# Altium PCB 24V-20A-Power-Board-v1.0.PcbDoc (part 1 of 4)
Units mil, origin at the board's own origin, x right, y up, seen from the top; angles counter-clockwise.
Board outline 6298 x 5166 mil, 4 copper layers (Top Layer, Layer-1, Layer-2, Bottom Layer), stack 61.653 mil thick; 190 components, 110 nets, 477 pads, 30 vias.
Unrouted connection lines stored in the file: 351.
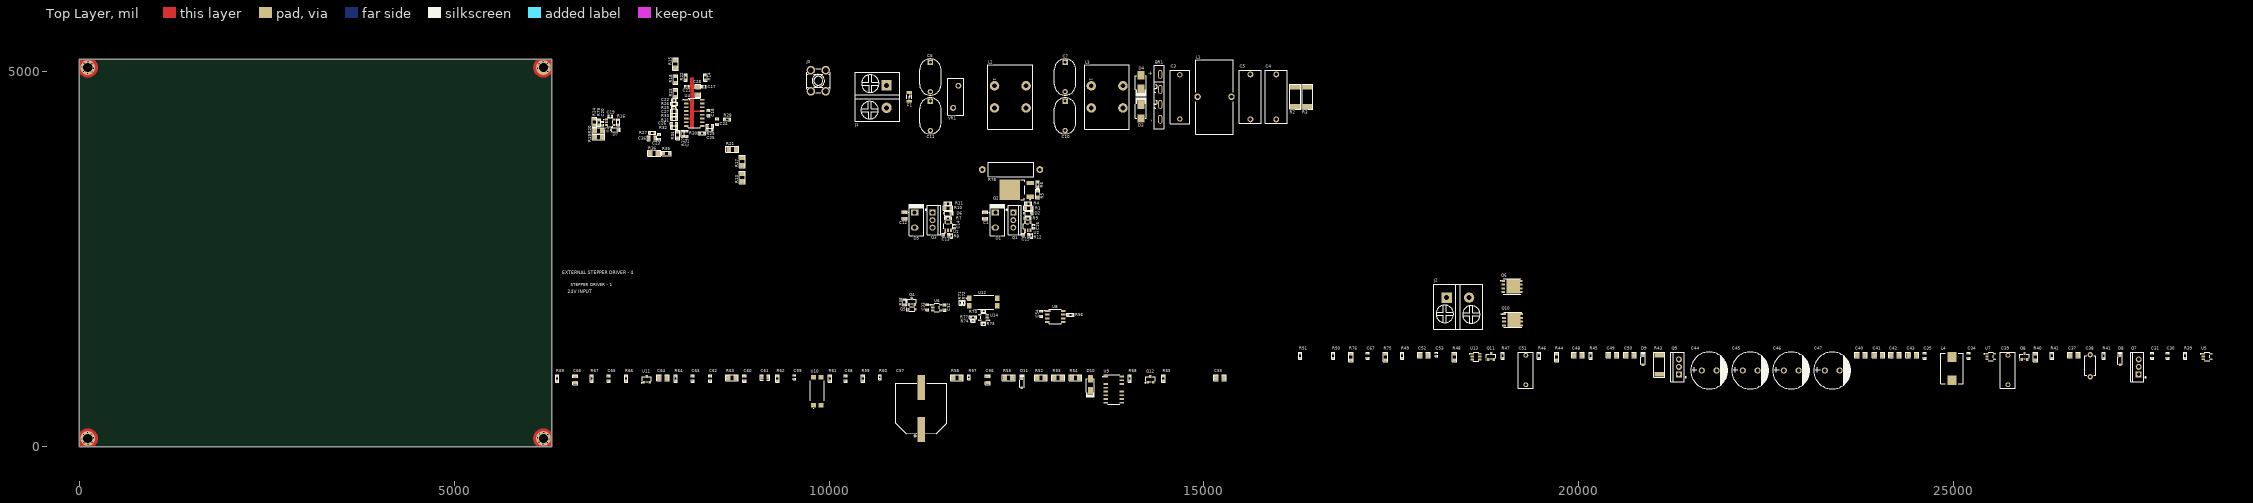
[diagram p0: Top Layer view]
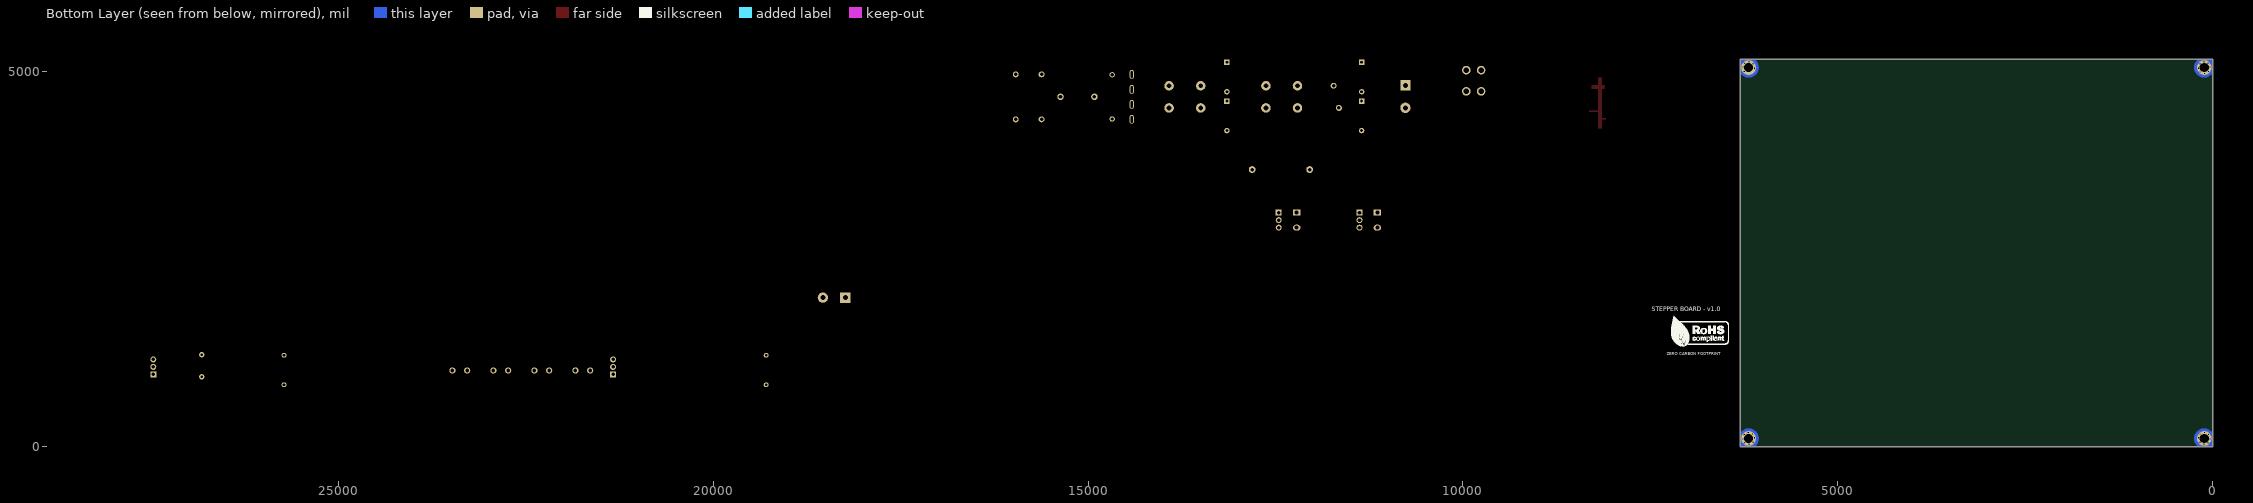
[diagram p1: Bottom Layer view, seen from below]

## Layer stack, top to bottom
Top Solder: solder mask 0.394, Solder Resist, Dk 3.5
Top Layer: signal copper 1.378
Dielectric 2: prepreg 7.992, PP-006, Dk 4.1
Layer-1: signal copper 1.181
Dielectric 1: core 40.551, FR-4, Dk 4.8
Layer-2: signal copper 1.181
Dielectric 3: prepreg 7.992, PP-006, Dk 4.1
Bottom Layer: signal copper 1.378
Bottom Solder: solder mask 0.394, Solder Resist, Dk 3.5

## Board outline
0,0 0,5163.74 0,5166 6298,5166 6298,0

## Design rules (kind name [scope] priority, off if disabled: settings)
Clearance [All] p1: gap=7 ignorepadtopadclearanceinfootprint=FALSE
HoleSize [All] p1: absolutevalues=TRUE maxlimit=1000 minlimit=1 maxpercent=80.000 minpercent=20.000
HoleToHoleClearance [All] p1: gap=1 allowstackedmicrovias=TRUE
MinimumSolderMaskSliver [All] p1: minsoldermaskwidth=0
PolygonConnect [All] p1: connectstyle=Direct reliefconductorwidth=10 reliefentries=4 polygonreliefangle="90 Angle" airgapwidth=10
RoutingVias [All] p1: holewidth=11.81 width=23.62 viastyle="Through Hole" minholewidth=11.81 minwidth=23.62 maxholewidth=11.81 maxwidth=23.62
SilkToSilkClearance [All] p1: silktosilkclearance=0
SilkToSolderMaskClearance [IsPad] p1: minsilkscreentomaskgap=0 clearancetoexposedcopper=TRUE
SolderMaskExpansion [All] p1: expansion=4 istentingtop=FALSE
UnRoutedNet [All] p1: checkbadconnections=TRUE
Width [All] p1: maxlimit=100 minlimit=6 preferedwidth=12 minimp=50.000000 maximp=50.000000 favimp=50.000000
24 further rules are at their usual default settings.

## Classes and differential pairs
component class U_Connector_Sheet: J1 J2 J3
component class U_24V_Sheet: C30 C31 C32 C33 C34 C35 C37 C38 C39 C40 C41 C42 C43 C44 C45 C46 C47 C48 C49 C50 C51 C52 C53 C54 C55 C56 C57 C58 C59 C60 C61 C62 C63 C64 C65 C66 C67 D8 D9 D10 D11 L4 Q4 Q5 Q6 Q7 Q8 Q9 Q10 Q11 Q12 R38 R39 R40 R41 R42 R43 R44 R45 R46 R47 R48 R49 R50 R51 R52 R53 R54 R55 R56 R57 R58 R59 R60 R61 R62 R63 R64 R65 R66 R67 R68 R69 R70 R71 R72 R73 R74 R75 R76 R77 T3 T4 U5 U6 U7 U8 U9 U10 U11 U12 U13 U14
component class U_Power_Sheet: BR1 C1 C3 C4 C5 C6 C7 C10 C11 C12 C13 C14 C15 C16 C17 C18 C19 C20 C21 C22 C23 C24 C25 C26 C27 C28 C29 C36 D1 D2 D3 D4 D5 D6 D7 F1 L1 L2 L3 Q1 Q2 Q3 R1 R2 R3 R4 R5 R6 R7 R8 R9 R10 R11 R12 R13 R14 R15 R16 R17 R18 R19 R20 R21 R22 R23 R24 R25 R26 R27 R28 R29 R30 R31 R32 R33 R34 R35 R36 R37 R78 R79 U1 U2 U3 U4 VR1

## Components (designator, comment, footprint, x,y, rotation, side; value= is the part's Value field where it differs from the comment)
BR1 "GBU2510-G" GBU 14417,4665.85 r270 top
C1 "470pF" Cap-0805 12084,3083 r90 top
C3 "470nF" 450MPK474J 14678,4665.85 r90 top
C4 "330nF" MPP334J2J15AJ22800 15964,4665.85 r90 top
C5 "330nF" MPP334J2J15AJ22800 15620,4665.85 r90 top
C6 "2.2nF" AY1222M47Y5UC63L0 11350,4931 r270 top
C7 "2.2nF" AY1222M47Y5UC63L0 13148,4931 r270 top
C10 "2.2nF" AY1222M47Y5UC63L0 13148,4412 r270 top
C11 "2.2nF" AY1222M47Y5UC63L0 11350,4412 r270 top
C12 "470pF" Cap-0805 11008,3083 r90 top
C13 "2.2uF" CAP-0603 11560,2823 r180 top
C14 "100pF" Cap-0402 11672,2938 r270 top
C15 "2.2uF" CAP-0603 12626,2823 r180 top
C16 "100pF" Cap-0402 12733,2938 r270 top
C17 "22PF" Cap-0402 8332,4805 r0 top value=22pF
C18 "1uF" Cap-0603 8392,4451 r270 top
C19 "100nF" cap-0402 7081.5,4412 r0 top
C20 "100nF" cap-0402 6976,4309 r270 top
C21 "22PF" Cap-0402 8104,4805 r180 top value=22pF
C22 "1nF" Cap-0402 7932,4622 r0 top
C23 "820pF" Cap-0603 7734,4132 r90 top
C24 "1000pF" Cap-0603 8509,4335 r90 top
C25 "6.8nF" Cap-0603 8409,4277 r180 top
C26 "1nF" Cap-0603 7932,4308 r0 top
C27 "6.8nF" Cap-0603 7933,4478 r0 top
C28 "220nF" Cap-1206 8251,4747 r270 top
C29 "680pF" Cap-0603 8099,4174 r90 top
C30 "1uF" Cap-0603 27858.02,1212.51 r90 top
C31 "2.2uF" Cap-0603 27648.02,1212.51 r90 top
C32 "4.7uF" Cap-0603 11543,1856 r90 top
C33 "1uF" Cap-0603 11310,1859 r90 top
C34 "1uF" Cap-0603 25203.02,1212.51 r90 top
C35 "2.2uF" Cap-0603 24616.02,1212.51 r90 top
C36 "2.2uF" Cap-0805 7637,4116 r180 top
C37 "82pF" Cap-1206 26606.02,1222.51 r0 top
C38 "2.2nF" KJKF222M2FF7035A075E 26823.02,1078.51 r90 top
C39 "4.7nF" MMK472J3AC2KN206G0 25725.02,1021.51 r90 top
C40 "4.7uF" Cap-1206 23766.02,1222.51 r0 top
C41 "4.7uF" Cap-1206 23996.02,1222.51 r0 top
C42 "4.7uF" Cap-1206 24219.02,1222.51 r0 top
C43 "4.7uF" Cap-1206 24449.02,1222.51 r0 top
C44 "680uF" ERS1HM681W20OT 21740.02,1015.51 r0 top
C45 "680uF" ERS1HM681W20OT 22287.02,1015.51 r0 top
C46 "680uF" ERS1HM681W20OT 22834.02,1015.51 r0 top
C47 "680uF" ERS1HM681W20OT 23381.02,1015.51 r0 top
C48 "82pF" Cap-1206 19992.02,1222.51 r0 top
C49 "82pF" Cap-1206 20452.02,1222.51 r0 top
C50 "150pF" Cap-1206 20682.02,1222.51 r0 top
C51 "4.7nF" MMK472J3AC2KN206G0 19294.02,1021.51 r90 top
C52 "82pF" Cap-1206 17938.02,1222.51 r0 top
C53 "RF15N3R3C500CT" Cap-0402 18100.02,1230.51 r90 top
C54 "1uF" Cap-0603 12831,1773 r90 top
C55 "0.1uF" Cap-1206 15213.02,917.51 r0 top
C56 "0.1uF" Cap-0805 12116.02,892.51 r90 top value=100nF
C57 "1000uF" VZH102M1HTR-1616 11229.02,510.51 r90 top
C58 "100nF" Cap-0603 10222.02,907.51 r90 top
C59 "47nF" Cap-0402 9536.02,925.51 r90 top
C60 "4.7UF" Cap-0603 8871.02,907.51 r90 top
C61 "0.1uF" Cap-0805 9144.02,922.51 r0 top value=100nF
C62 "100pF" Cap-0603 8412.02,907.51 r90 top
C63 "10pF" Cap-0603 8182.02,907.51 r90 top
C64 "220nF" Cap-1206 7785.02,917.51 r0 top
C65 "10pF" Cap-0603 7062.02,907.51 r90 top
C66 "0.01uF" Cap-0805 6615.02,892.51 r90 top value=10nF
C67 "1uF" Cap-0603 17185.02,1212.51 r90 top
D1 "MUR860G" TO-220-2 12217,3020.99 r270 top
D2 "BAT54HT1G" SOD-323 12650.09,3112 r180 top
D3 "RS1MB-13-F" SMB_ 14159,4468.45 r90 top value=15pF
D4 "RS1MB-13-F" SMB_ 14159,4863 r270 top value=15pF
D5 "MUR860G" TO-220-2 11140,3020.99 r270 top
D6 "BAT54HT1G" SOD-323 11578.1,3112 r180 top
D7 "BZT52C5V1S-7-F" SOD-323 7136,4227 r180 top
D8 "SD103BW-7-F" SOD-123 27221.02,1153.51 r90 top
D9 "SD103BW-7-F" SOD-123 20857.02,1153.51 r90 top
D10 "US1J-13-F" SMA 13485.02,827.51 r90 top
D11 "SD103BW-7-F" SOD-123 12571.02,848.51 r90 top
F1 "0501010.WR1" "Fuse 1206 (3216 Metric)" 11070,4665.85 r90 top
J1 "DBT50G-7.62-2P-BK-P" DBT50G-7.62-2P-BK-P 10766,4669 r270 top
J2 "DBT50G-7.62-2P-BK-P" DBT50G-7.62-2P-BK-P 18387,1988 r0 top
J3 "T44001" T44001 9855.58,4880.73 r0 top
L1 "150uH" 7447076 15141,4665.85 r90 top
L2 "1MH" 7448031501 12417,4665.85 r270 top value=1mH
L3 "1MH" 7448031501 13708,4665.85 r270 top value=1mH
L4 "PA2607.301NLT" PA2607.301NLT 24976.02,1040.51 r90 top
Q1 "IPA60R120P7XKSA1" TO-220-3 12456.98,3021.49 r270 top
Q2 "AOD4S60" TO-252-2L 12547,3426 r90 top
Q3 "IPA60R120P7XKSA1" TO-220-3 11378.98,3021.49 r270 top
Q4 "MMBTA06-7-F" SOT-23 11103,1936 r0 top
Q5 "BZX384-C15,115" SOD-323 11104,1834 r0 top
Q6 "CSD19502Q5B" VSON-CLIP-8(6x5) 19111,2137 r0 top
Q7 "IPA60R120P7XKSA1" TO-220-3 27469.02,1063.51 r90 top
Q8 "BC858C-7-F" SOT-23 25946.02,1202.51 r0 top
Q9 "IPA60R120P7XKSA1" TO-220-3 21336.02,1063.51 r90 top
Q10 "CSD19502Q5B" VSON-CLIP-8(6x5) 19120,1692 r0 top
Q11 "BC858C-7-F" SOT-23 18830.02,1202.51 r0 top
Q12 "MMBT2222A-7-F" SOT-23 14286.02,897.51 r0 top
R1 "18.2R" RES-0805 12658,3181.5 r180 top
R2 "30mR" RES-2512 16216,4665.75 r270 top
R3 "30mR" RES-2512 16381,4665.75 r270 top
R4 "10K" Res-0603 12658,3243 r180 top
R5 "18.2R" RES-0805 12782,3370 r90 top
R6 "49K9" Res-0603 12782,3497 r270 top
R7 "2.2R" Res-0603 11587,3046 r0 top
R8 "10R" Res-0402 11634,2812 r90 top
R9 "2.2R" Res-0603 12648.49,3046 r0 top
R10 "18.2R" RES-0805 11586,3181.5 r180 top
R11 "10K" Res-0603 11586,3243 r180 top
R12 "10R" Res-0402 12702,2812 r90 top
R13 "2.7MR" Res-1206 8842,3592 r90 top
R14 "16.5K" Res-0603 8351,4924 r90 top
R15 "3.09MR" Res-1206 7950,5106 r90 top
R16 "10K" Res-0603 7189,4326 r90 top value=10kR
R17 "2.7MR" Res-1206 8842,3805 r90 top
R18 "2.74MR" RES-0805 7950,4895.5 r90 top
R19 "511K" Res-1206 6925,4130 r0 top
R20 "511K" Res-1206 6925,4216 r180 top
R21 "2.7MR" Res-1206 8708,3966 r0 top
R22 "16.5K" Res-0603 8085,4924 r90 top
R23 "2.74MR" RES-0805 7950,4714 r90 top
R24 "49.9K" RES-0805 6871,4328 r270 top
R25 "95.3K" Res-0402 7932,4526 r0 top
R26 "133K" Res-0603 7933,4575 r0 top
R27 "7.5K" Res-0603 7639,4188 r0 top
R28 "100R" Res-0603 8640,4366 r0 top
R29 "66.5K" Res-0603 8409,4225 r0 top
R30 "66.5K" Res-0603 8303,4180 r180 top
R31 "66.5K" Res-0603 7932,4378 r0 top
R32 "124K" Res-0603 7932,4257 r0 top
R33 "66.5K" Res-0603 7932,4428 r0 top
R34 "2.74MR" RES-0805 7980,4157 r270 top
R35 "2.74MR" RES-0805 7833,3912 r180 top
R36 "2.7MR" Res-1206 7667,3912 r180 top
R37 "82.5K" Res-0603 8048,4174 r90 top
R38 "6.8K" Res-0603 11006,1927 r90 top value=6.8kR
R39 "4.7R" Res-0603 28088.02,1213.51 r90 top
R40 "10R" RES-0805 26091.02,1197.51 r90 top
R41 "22R" Res-0603 27003.02,1213.51 r90 top
R42 "4.7K" Res-0603 26313.02,1213.51 r90 top
R43 "0.5mR" RES-2512 21074.02,1092.51 r90 top
R44 "10R" RES-0805 19707.02,1197.51 r90 top
R45 "22R" Res-0603 20159.02,1213.51 r90 top
R46 "59.7K" Res-0603 19470.02,1213.51 r90 top value=59.7kR
R47 "4.7K" Res-0603 18985.02,1213.51 r90 top
R48 "200R" RES-0805 18343.02,1197.51 r90 top
R49 "10K" Res-0603 17645.02,1213.51 r90 top
R50 "4.7R" Res-0603 16725.02,1213.51 r90 top
R51 "113K" Res-0603 16285.02,1213.51 r90 top value=113kR
R52 "1K" Res-1206 12826.02,917.51 r0 top
R53 "1K" Res-1206 13056.02,917.51 r0 top
R54 "1K" Res-1206 13286.02,917.51 r0 top
R55 "374K" Res-1206 12396.02,917.51 r0 top value=374kR
R56 "10K" Res-0603 13221,1761 r180 top
R57 "6.04K" Res-0402 11868.02,925.51 r90 top
R58 "374K" Res-1206 11706.02,917.51 r0 top value=374kR
R59 "750K" Res-0603 10452.02,908.51 r90 top
R60 "6.04K" Res-0402 10677.02,925.51 r90 top
R61 "147K" Res-0603 10012.02,908.51 r90 top value=147kR
R62 "10K" Res-0603 9311.02,908.51 r90 top
R63 "374K" Res-1206 8704.02,917.51 r0 top value=374kR
R64 "487K" Res-0603 7952.02,908.51 r90 top value=487kR
R65 "113K" Res-0603 14461.02,908.51 r90 top value=113kR
R66 "10K" Res-0603 7292.02,908.51 r90 top
R67 "10K" Res-0603 6832.02,908.51 r90 top
R68 "10K" Res-0603 14011.02,908.51 r90 top
R69 "16.9K" Res-0603 6372.02,908.51 r90 top
R70 "1M" Res-0402 12060,1809 r180 top value=1MR
R71 "6.04K" Res-0402 11753,1920 r90 top
R72 "6.04K" Res-0402 11796,1920 r90 top
R73 "330K" Res-0402 12060,1637 r0 top value=330kR
R74 "1M" Res-0402 11918,1679 r0 top value=1MR
R75 "10R" RES-0805 17423.02,1197.51 r90 top
R76 "10R" RES-0805 16963.02,1197.51 r90 top
R77 "10K" Res-0603 11919,1725 r180 top
R78 "KNP2W-47Ω±5% T" KNP2W-47O±5 12427,3696 r180 top
R79 "1.1MR" Res-0603 6930,4324 r90 top
U1 "UCC27517DBVR" SOT-23-5 11587,2938 r90 top
U2 "UCC27517DBVR" SOT-23-5 12648.49,2938 r90 top
U3 "TLV171IDBVR" SOT-23-5 7080,4327 r0 top
U4 "UCC28064ADR" SOIC-16 8202,4451 r0 top locked
U5 "UCC24612-1DBVR" SOT-23-5 28381.02,1202.51 r0 top
U6 "LP2981-50DBVR" SOT-23-5 11435,1855 r0 top
U7 "UCC24612-1DBVR" SOT-23-5 25496.02,1202.51 r0 top
U8 "LP2951ACMX/NOPB" SOIC-8 13015,1736 r0 top
U9 "UCC25630-1DDBR" UCC25630-1DDBR 13798.02,759.51 r0 top
U10 "VO618A-3X017T" "4-SMD  (SFH617A-1X007T)" 9843.02,738.51 r90 top
U11 "TL431ACDBZR" SOT-23 7567.02,897.51 r0 top
U12 "VO618A-3X017T" "4-SMD  (SFH617A-1X007T)" 12057,1928 r0 top
U13 "INA181A4IDBVR" SOT-23-6 18630.02,1201.51 r0 top
U14 "TL331IDBVR" SOT-23-5 12059,1723 r180 top
VR1 "B72210S2271K101" B72210S2271K101 11689,4666.26 r90 top value=195pF

## Footprints (in the part's own frame and the unit in brackets; to place one, negate y for a bottom-side part, rotate by r counter-clockwise, add the part's x,y. Pads: shape width x height; smd on the part's side, far side on the other; paste and mask are expansions set on the pad)
"4-SMD  (SFH617A-1X007T)" [mm]
  rect 1.52x1.78 smd mask+0.07: 1(-4.765,1.27) 2(-4.765,-1.27) 3(4.765,-1.27) 4(4.765,1.27)
  silkscreen extent -5.81,-2.36 3.53,2.36, body extent -5.08,-2.29 5.08,2.29, height 3.75
450MPK474J [mm]
  round 1.8 hole 1.092 paste-0.8 mask+0: 1(-7.5,0) 2(7.5,0)
  silkscreen extent -9.06,-3.3 9.06,3.3, body extent -9,-3.25 9,3.25, height 11.8
7447076 [mm]
  round 2.2 hole 1.2: 1(0,5.75) 2(0,-5.75)
  silkscreen extent -12.61,-6.3 12.61,6.3, body extent -12.56,-6.25 12.56,6.25, height 25.56
7448031501 [mm]
  round 3.2 hole 1.6: 1(-3.75,-5.35) 2(3.75,-5.35) 3(3.75,5.35) 4(-3.75,5.35)
  silkscreen extent -10.92,-7.57 10.92,7.54, body extent -10.87,-7.5 10.87,7.5, height 21.65
AY1222M47Y5UC63L0 [mm]
  rect 1.8x1.8 hole 1: 1(-5,0)
  round 1.8 hole 1: 2(5,0)
  silkscreen extent -6.12,-3.63 6.12,3.63, body extent -6,-3.5 6,3.5, height 16
B72210S2271K101 [mm]
  round 2 hole 1.2 paste+0 mask+0.051: 1(-3.749,0.899) 2(3.749,-0.899)
  silkscreen extent -6.27,-2.72 6.25,2.7, body extent -6.25,-2.7 6.25,2.7, height 13.35
Cap-0402 [mil]
  rect 18x25 smd mask+2.36: 1(-18.5,0) 2(18.5,0)
  silkscreen extent -31,-16 31,16, body extent -20,-10 20,10, height 19
cap-0402 [mil]
  rect 18x25 smd mask+2.36: 1(-18.5,0) 2(18.5,0)
  silkscreen extent -31,-16 31,16, body extent -20,-10 20,10, height 19
CAP-0603 [mil]
  rect 30x35 smd mask+2.36: 1(-30,0) 2(30,0)
  silkscreen extent -49,-21 49,21, body extent -32,-16 31,16, height 34
Cap-0603 [mil]
  rect 30x35 smd mask+2.36: 1(-30,0) 2(30,0)
  silkscreen extent -49,-21 49,21, body extent -32,-16 31,16, height 34
Cap-0805 [mil] "SMD 0805"
  rect 40x60 smd mask+2.76: 1(-40,0) 2(40,0)
  silkscreen extent -64,-34 64,34, body extent -39,-25 39,25, height 30
Cap-1206 [mil] "SMD 1206"
  rect 60x70 smd: 1(-50,0) 2(50,0)
  silkscreen extent -84,-39 84,39, body extent -63,-31 63,32, height 39
DBT50G-7.62-2P-BK-P [mm]
  rect 3.5x3.5 hole 1.7: 1(-3.81,0)
  round 3.5 hole 1.7: 2(3.81,0)
  silkscreen extent -8.22,-10.65 8.38,4.55, body extent -8.25,-10.67 8.25,4.53, height 16.3
ERS1HM681W20OT [mm]
  round 2.1 hole 1.2 paste+0 mask+0.05: 1(-2.5,0) 2(2.5,0)
  silkscreen extent -6.25,-6.25 6.25,6.25, body extent -6.24,-6.25 6.25,6.25, height 19.91
"Fuse 1206 (3216 Metric)" [mm] "0.126\" L x 0.062\" W x 0.026\" H (3.20mm x 1.58mm x 0.65mm)"
  rect 1.06x1.82 smd: 1(-1.528,0) 2(1.528,0)
  silkscreen extent -0.68,-0.85 0.68,0.85, body extent -1.6,-0.79 1.6,0.79, height 0.85
GBU [mm]
  oval 3x1.4 hole 0.7 slot 2.2 at 0 deg paste+0 mask+0.051: 1(-7.62,0) 2(-2.54,0) 3(2.54,0) 4(7.62,0)
  silkscreen extent -10.8,-2.28 10.79,1.25, body extent -10.75,-2.26 10.75,1.2, height 19.9
KJKF222M2FF7035A075E [mm]
  round 1.8 hole 0.92 paste+0 mask+0.051: 1(-3.75,0) 2(3.75,0)
  silkscreen extent -3.22,-1.8 3.38,1.8, body extent -4.08,-1.85 4.08,1.85, height 6.75
KNP2W-47O±5 [mm]
  round 2.3 hole 1.2 paste+0 mask+0.051: 1(-9.75,0) 2(9.75,0)
  silkscreen extent -7.75,-2.5 7.75,2.5, body extent -10.05,-2.51 10.05,2.51, height 5.01
MMK472J3AC2KN206G0 [mm]
  round 1.65 hole 0.9 paste+0 mask+0.051: 1(-5,0) 2(5,0)
  silkscreen extent -6.1,-2.54 6.1,2.54, body extent -6,-2.5 6,2.5, height 11
MPP334J2J15AJ22800 [mm]
  round 2 hole 1.2 paste+0 mask+0.051: 1(-7.62,0) 2(7.62,0)
  silkscreen extent -9,-3.75 9,3.75, body extent -9,-3.75 9,3.75, height 13.5
PA2607.301NLT [mm]
  rect 3.3x3.05 smd: 1(-3.935,0) 2(3.935,0)
  silkscreen extent -5.15,-3.83 5.15,3.83
Res-0402 [mil]
  rect 18x25 smd mask+2.17: 1(-18.5,0) 2(18.5,0)
  silkscreen extent -32,-17 32,16, body extent -23,-11 23,11, height 16
Res-0603 [mil]
  rect 30x35 smd: 1(-30,0) 2(30,0)
  silkscreen extent -48,-21 48,21, body extent -31,-17 31,17, height 18
RES-0805 [mil] "SMD 0805"
  rect 40x50 smd: 1(-40,0) 2(40,0)
  silkscreen extent -64,-29 64,29, body extent -39,-25 39,24, height 24
Res-1206 [mil]
  rect 60x70 smd: 1(-50,0) 2(50,0)
  silkscreen extent -84,-39 84,39, body extent -63,-31 63,31, height 24
RES-2512 [mm]
  rect 1.6x3.4 smd: 1(-3.25,0) 2(3.25,0)
  silkscreen extent -4.24,-1.85 4.24,1.85, body extent -3.17,-1.63 3.18,1.63, height 0.58
SMA [mm]
  rect 2.5x1.7 smd: 1(-2,0) 2(2,0)
  silkscreen extent -4.45,-1.42 2.06,1.42, body extent -2.6,-1.3 2.6,1.3, height 2.4
SMB_ [mm]
  rect 2.8x2.4 smd: 1(-2.3,0) 2(2.3,0)
  silkscreen extent -2.21,-1.9 4.83,1.91, body extent -2.7,-1.8 2.7,1.8, height 2.3
SOD-123 [mm]
  rect 0.95x0.9 smd: 1(-1.575,0) 2(1.575,0)
  silkscreen extent -1.37,-0.8 2.82,0.8, body extent -1.82,-0.78 1.83,0.78, height 1.5
SOD-323 [mm]
  rect 0.8x0.9 smd mask+0.055: 1(-1.15,0) 2(1.15,0)
  silkscreen extent -2.01,-0.79 0.94,0.79, body extent -1.3,-0.67 1.3,0.67, height 1.1
SOIC-8 [mm]
  rect 1.55x0.6 smd: 1(-2.7,1.905) 2(-2.7,0.635) 3(-2.7,-0.635) 4(-2.7,-1.905) 5(2.7,-1.905) 6(2.7,-0.635) 7(2.7,0.635) 8(2.7,1.905)
  silkscreen extent -3.76,-2.49 1.99,2.49, body extent -3,-2.45 3,2.45, height 1.7
SOIC-16 [mm]
  rect 1.55x0.6 smd: 1(-2.7,4.445) 2(-2.7,3.175) 3(-2.7,1.905) 4(-2.7,0.635) 5(-2.7,-0.635) 6(-2.7,-1.905) 7(-2.7,-3.175) 8(-2.7,-4.445) 9(2.7,-4.445) 10(2.7,-3.175) 11(2.7,-1.905) 12(2.7,-0.635) 13(2.7,0.635) 14(2.7,1.905) 15(2.7,3.175) 16(2.7,4.445)
  silkscreen extent -3.82,-5 2.03,5, body extent -3,-4.95 3,4.95, height 1.75
SOT-23 [mm] "TRANS NPN 40V 0.6A SOT23"
  rect 0.82x0.92 smd: 1(-0.95,-1) 2(0.95,-1) 3(0,1)
  silkscreen extent -1.68,-1.3 1.55,0.81, body extent -1.5,-1.25 1.5,1.25, height 1.05
SOT-23-5 [mm]
  rect 1.1x0.6 smd: 1(-1.3,0.95) 2(-1.3,0) 3(-1.3,-0.95) 4(1.3,-0.95) 5(1.3,0.95)
  silkscreen extent -2.13,-1.5 0.88,1.5, body extent -1.4,-1.45 1.4,1.45, height 1.45
SOT-23-6 [mm]
  rect 1.22x0.62 smd: 1(-1.31,0.95) 2(-1.31,0) 3(-1.31,-0.95) 4(1.31,-0.95) 5(1.31,0) 6(1.31,0.95)
  silkscreen extent -2.18,-1.52 0.86,1.52, body extent -1.5,-1.5 1.5,1.5, height 1.47
T44001 [mm]
  round 2.9 hole 1.9 paste+0 mask+0.051: 1(-2.5,-3.6) 1(-2.5,3.6) 1(2.5,-3.6) 1(2.5,3.6)
  silkscreen extent -4,-4 4,4, body extent -4.1,-4.1 4.1,4.1, height 9.93
TO-220-2 [mm]
  rect 2x2.5 hole 1.4 paste+0 mask+0.051: 1(-2.54,0)
  oval 2x2.5 hole 1.4 paste+0 mask+0.051: 2(2.54,0)
  silkscreen extent -5.35,-2.06 5.35,3.14, body extent -5.33,-1.71 5.33,3.1, height 22.95
TO-220-3 [mm]
  rect 2x2 hole 1.2 paste+0 mask+0.051: 1(-2.54,0)
  round 2 hole 1.2 paste+0 mask+0.051: 2(0,0) 3(2.54,0)
  silkscreen extent -5,-2.49 5.03,2.72, body extent -5.05,-1.75 5.05,2.75, height 14.9
TO-252-2L [mm]
  rect 1.5x2.5 smd: 1(-2.3,-3.45) 3(2.3,-3.45)
  rect 7x7 smd: 2(0,3.45)
  silkscreen extent -3.35,-3.53 3.33,-0.2, body extent -3.27,-4.31 3.27,5.63, height 2.34
UCC25630-1DDBR [mm]
  rect 1.55x0.6 smd paste+0 mask+0.051: 1(-2.7,4.445) 3(-2.7,1.905) 4(-2.7,0.635) 5(-2.7,-0.635) 6(-2.7,-1.905) 7(-2.7,-3.175) 8(-2.7,-4.445) 9(2.7,-4.445) 10(2.7,-3.175) 11(2.7,-1.905) 12(2.7,-0.635) 14(2.7,1.905) 15(2.7,3.175) 16(2.7,4.445)
  silkscreen extent -3.71,-5 2,5, body extent -3.01,-4.95 3.01,4.95, height 1.75
VSON-CLIP-8(6x5) [mm]
  rect 1.27x0.7 smd paste-100 mask+0.051: 1(-3,1.904) 2(-3,0.636) 3(-3,-0.636) 4(-3,-1.906)
  rect 1x0.7 smd paste-100 mask+0.051: 5(3,-1.904) 6(3,-0.634) 7(3,0.636) 8(3,1.906)
  rect 4.5x4.9 smd paste-100 mask+0.051: 8(0.39,0.001)
  silkscreen extent -3.91,-2.57 3,2.55, body extent -3,-2.45 3,2.45, height 1.1
VZH102M1HTR-1616 [mm]
  rect 8.5x2.6 smd paste+0 mask+0.051: 1(-7.093,0) 2(7.093,0)
  silkscreen extent -9.77,-8.58 8.58,8.58, body extent -9,-8.5 9,8.5, height 16.55

## Part data
BR1: "BRIDGE RECT 1PHASE 1KV 25A GBU", Average Rectified Current=25A, LCSC Part Number=C3012677, Manufacturer=Comchip, Max Operating Temperature=150°C, Max Reverse Leakage Current=10uA, Max Surge Current=350A, Min Operating Temperature=-55°C, Package Quantity=200, ComponentLink1Description=https://datasheet.ciiva.com/886/gbu25005-gthru-gbu2510-grevc-886136.pdf?src-supplier=Digikey, ComponentLink1URL=https://datasheet.ciiva.com/886/gbu25005-gthru-gbu2510-grevc-886136.pdf?src-supplier=Digikey, Item Type="Bridge Rectifier", Lead Free="Lead Free", Manufacturer Part Number=GBU2510-G, Mounting Technology="Through Hole", Packaging=Rail/Tube, Pricing="26=1.143, 100=1.0083, 500=0.9074, 1000=0.8027 (USD)", RoHS=Yes, RoHS Compliant=Yes, Series=-, Stock=26, Supplier="Arrow Electronics"
C1 C12: library part CC0805KRX7RBBB471, "CAP CER 470PF 500V X7R 0805", Case Code (Imperial)=0805, Case Code (Metric)=2012, Dielectric=X7R, LCSC Part Number=C113867, Manufacturer=Yageo, Max Operating Temperature=125°C, Min Operating Temperature=-55°C, Package Quantity=4000, Tolerance=10%, Voltage Rating=500V, Case/Package=0805, ComponentLink1Description=http://www.mouser.com/ds/2/447/Yageo_UPY-GP_NP0_16V-to-50V_9-358835.pdf?src-supplier=Mouser, ComponentLink1URL=http://www.mouser.com/ds/2/447/Yageo_UPY-GP_NP0_16V-to-50V_9-358835.pdf?src-supplier=Mouser, ComponentLink2Description=https://www.yageo.com/upload/media/product/products/datasheet/mlcc/UPY-NP0X7R_MV_100-to-630V_21.pdf?src-supplier=Digikey, ComponentLink2URL=https://www.yageo.com/upload/media/product/products/datasheet/mlcc/UPY-NP0X7R_MV_100-to-630V_21.pdf?src-supplier=Digikey, ComponentLink3Description=http://www.yageo.com/documents/recent/UPY-NP0X7R_MV_100-to-630V_19.pdf?src-supplier=Digikey, ComponentLink3URL=http://www.yageo.com/documents/recent/UPY-NP0X7R_MV_100-to-630V_19.pdf?src-supplier=Digikey, Item Type=Capacitors, Length=0.079inch, Manufacturer Part Number=CC0805KRX7RBBB471, Mounting Technology="Surface Mount", Packaging="Tape and Reel", Pricing="4000=0.0157, 8000=0.0139, 24000=0.013, 48000=0.0125, 100000=0.0094 (USD)", RoHS=Yes, RoHS Compliant=Yes, Series=CC, Stock=16000, Supplier="Arrow Electronics", Thickness=0.037inch, Voltage Rating (DC)=500V, Width=0.049inch
C3: library part 450MPK474J, "CAP FILM 0.47UF 5% 450VDC RADIAL", Case/Package=Radial, Dielectric Material=Polypropylene, LCSC Part Number=C2798220, Manufacturer=Rubycon, Max Operating Temperature=105°C, Min Operating Temperature=-40°C, Package Quantity=1, Tolerance=5%, Voltage Rating (DC)=450V, ComponentLink1Description=https://datasheet.ciiva.com/6281/e-mpk-6281321.pdf?src-supplier=Digikey, ComponentLink1URL=https://datasheet.ciiva.com/6281/e-mpk-6281321.pdf?src-supplier=Digikey, ComponentLink2Description=https://datasheet.ciiva.com/15021/e-mpk-15021932.pdf?src-supplier=Digikey, ComponentLink2URL=https://datasheet.ciiva.com/15021/e-mpk-15021932.pdf?src-supplier=Digikey, Height - Seated (Max)=0.433inch, Item Type="Film Capacitors", Lead Pitch=0.591inch, Length=0.709inch, Manufacturer Part Number=450MPK474J, Mounting Technology="Through Hole", Packaging="Cut Tape", Pricing="1=0.84, 10=0.605, 100=0.4311, 4000=0.26942, 8000=0.25962, 12000=0.25531 (USD)", RoHS=Yes, RoHS Compliant=Yes, Series=MPK, Stock=4083, Supplier=Digikey, Termination="PC Pins", Width=0.256inch
C4 C5: library part MPP334J2J15AJ22800, "330nF -40℃~+105℃ ±5% 630V Plugin,P=15mm Polypropylene Film Capacitors (CBB) ROHS", LCSC Part Number=C506837, Manufacturer=KNSCHA, Item Type=Capacitors, Manufacturer Part Number=MPP334J2J15AJ22800, RoHS=No, Supplier=LCSC
C6 C7 C10 C11: library part AY1222M47Y5UC63L0, "CAP CER 2200PF 760VAC Y5U RADIAL", LCSC Part Number=C1620433, Supplier Part Number=72-AY1222M47Y5UC63L0, Category="Ceramic Capacitors", ComponentLink1Description=LCSC, ComponentLink2Description=http://www.farnell.com/datasheets/2719986.pdf?src-supplier=Farnell, ComponentLink2URL=http://www.farnell.com/datasheets/2719986.pdf?src-supplier=Farnell, Item Type=Capacitor, Pricing="1=0.72, 10=0.395, 50=0.395, 100=0.326, 1000=0.216, 10000=0.19 (USD)", RoHS=No, Stock=23960, Supplier=Mouser
C13 C15: library part CC0603KRX5R8BB225, "CAP CER 2.2UF 25V X5R 0603", Case Code (Imperial)=0603, Case Code (Metric)=1608, Dielectric=X5R, LCSC Part Number=C309478, Manufacturer=Yageo, Max Operating Temperature=85°C, Min Operating Temperature=-55°C, Package Quantity=4000, Resistor Type=Ceramic, Supplier Part Number 1=311-1786-1-ND, Tolerance=10%, Voltage Rating=25V, Capacitance=2.2uF, Case/Package=0603, ComponentLink1Description=https://www.verical.com/server-webapp/html/getDatasheet?partID=782757&src-supplier=Verical, ComponentLink1URL=https://www.verical.com/server-webapp/html/getDatasheet?partID=782757&src-supplier=Verical, Depth=0.8mm, Halogen Free="Halogen Free", Item Type=Capacitor, Lead Free="Lead Free", Length=1.6mm, Manufacturer Part Number=CC0603KRX5R8BB225, Mount="Surface Mount", Packaging="Tape and Reel", Pricing 1="1=0.4, 10=0.276, 50=0.1932, 100=0.1656, 500=0.1242, 1000=0.10488 (USD)", Radiation Hardening=No, RoHS Compliant=Yes, Stock 1=687936, Supplier 1=Digi-Key, Termination=SMD/SMT, Thickness=0.037inch, Voltage Rating (DC)=25V, Weight=7.1E-05oz, Width=0.031inch
C14 C16: library part CC0402JRNPO9BN101, "CAP CER 100PF 50V C0G/NPO 0402", Case Code (Imperial)=0402, Case Code (Metric)=1005, Dielectric=C0G, Dielectric Material=Ceramic, Insulation Resistance=100GR, LCSC Part Number=C106200, Manufacturer=Yageo, Max Operating Temperature=125°C, Min Operating Temperature=-55°C, Package Quantity=1, Supplier Part Number=8934564, Temperature Coefficient=30ppm/°C, Tolerance=5%, Voltage=50V, Case/Package=0402, Category="Ceramic Capacitors", ComponentLink1Description=https://datasheet.ciiva.com/11786/0900766b80d84fbf-11786101.pdf?src-supplier=Rs, ComponentLink1URL=https://datasheet.ciiva.com/11786/0900766b80d84fbf-11786101.pdf?src-supplier=Rs, ComponentLink2Description=https://datasheet.ciiva.com/23767/25787-23767888.pdf?src-supplier=Newark, ComponentLink2URL=https://datasheet.ciiva.com/23767/25787-23767888.pdf?src-supplier=Newark, ComponentLink3Description=https://datasheet.ciiva.com/28450/1443161-28450220.pdf?src-supplier=Element14, ComponentLink3URL=https://datasheet.ciiva.com/28450/1443161-28450220.pdf?src-supplier=Element14, ComponentLink4Description=https://datasheet.ciiva.com/8033/1443161-8033598.pdf?src-supplier=Element14, ComponentLink4URL=https://datasheet.ciiva.com/8033/1443161-8033598.pdf?src-supplier=Element14, ComponentLink5Description=https://datasheet.ciiva.com/143/mlccorderingcode-143990.pdf?src-supplier=Digi-Key, ComponentLink5URL=https://datasheet.ciiva.com/143/mlccorderingcode-143990.pdf?src-supplier=Digi-Key, ComponentLink6Description=https://datasheet.ciiva.com/143/mlccorderingcode-143989.pdf?src-supplier=Digi-Key, ComponentLink6URL=https://datasheet.ciiva.com/143/mlccorderingcode-143989.pdf?src-supplier=Digi-Key, ComponentLink7Description=https://datasheet.ciiva.com/143/mlccorderingcode-143991.pdf?src-supplier=Digi-Key, ComponentLink7URL=https://datasheet.ciiva.com/143/mlccorderingcode-143991.pdf?src-supplier=Digi-Key, Depth=0.5mm, Height=0.5mm, Item Type=Capacitor, Lead Free="Lead Free", Length=1mm, Manufacturer Part Number=CC0402JRNPO9BN101, Mounting Technology="Surface Mount", Packaging="Tape and Reel", Pins=2, Pricing="10000=0.002, 40000=0.0019, 150000=0.0018, 400000=0.0018, 1000000=0.0017 (USD)", Radiation Hardening=No, Reach SVHC Compliant=No, RoHS=Yes, RoHS Compliant=Yes, Series=CC, Stock=11720000, Supplier="Future Electronics", Termination=SMD/SMT, Thickness=0.022inch, Voltage Rating=50V, Voltage Rating (DC)=50V, Width=0.02inch
C17 C21: library part CC0402JRNPO9BN220, "CAP CER 22PF 50V C0G/NPO 0402", Case Code (Imperial)=0402, Case Code (Metric)=1005, Dielectric=C0G, Dielectric Material=Ceramic, Insulation Resistance=100GR, LCSC Part Number=C106203, Manufacturer=Yageo, Max Operating Temperature=125°C, Min Operating Temperature=-55°C, Package Quantity=1, Supplier Part Number 1=9105957, Temperature Coefficient=30ppm/°C, Tolerance=5%, Voltage=50V, Case/Package=0402, Category="Ceramic Capacitors", ComponentLink1Description=https://datasheet.ciiva.com/5789/1443161-5789509.pdf?src-supplier=Farnell, ComponentLink1URL=https://datasheet.ciiva.com/5789/1443161-5789509.pdf?src-supplier=Farnell, ComponentLink2Description=https://datasheet.ciiva.com/8033/1443161-8033606.pdf?src-supplier=Element14, ComponentLink2URL=https://datasheet.ciiva.com/8033/1443161-8033606.pdf?src-supplier=Element14, ComponentLink3Description=https://datasheet.ciiva.com/7656/1132289-7656615.pdf?src-supplier=Element14, ComponentLink3URL=https://datasheet.ciiva.com/7656/1132289-7656615.pdf?src-supplier=Element14, ComponentLink4Description=https://datasheet.ciiva.com/8033/1443161-8033607.pdf?src-supplier=Element14, ComponentLink4URL=https://datasheet.ciiva.com/8033/1443161-8033607.pdf?src-supplier=Element14, ComponentLink5Description=https://datasheet.ciiva.com/8033/1443161-8033605.pdf?src-supplier=Element14, ComponentLink5URL=https://datasheet.ciiva.com/8033/1443161-8033605.pdf?src-supplier=Element14, ComponentLink6Description=https://datasheet.ciiva.com/143/mlccorderingcode-143987.pdf?src-supplier=Digi-Key, ComponentLink6URL=https://datasheet.ciiva.com/143/mlccorderingcode-143987.pdf?src-supplier=Digi-Key, ComponentLink7Description=https://datasheet.ciiva.com/143/mlccorderingcode-143986.pdf?src-supplier=Digi-Key, ComponentLink7URL=https://datasheet.ciiva.com/143/mlccorderingcode-143986.pdf?src-supplier=Digi-Key, ComponentLink8Description=https://datasheet.ciiva.com/143/mlccorderingcode-143988.pdf?src-supplier=Digi-Key, ComponentLink8URL=https://datasheet.ciiva.com/143/mlccorderingcode-143988.pdf?src-supplier=Digi-Key, ComponentLink9Description=https://datasheet.ciiva.com/5425/upy-gp-np0-16v-to-50v-8-5425483.pdf?src-supplier=Mouser, ComponentLink9URL=https://datasheet.ciiva.com/5425/upy-gp-np0-16v-to-50v-8-5425483.pdf?src-supplier=Mouser, ComponentLink10Description=https://datasheet.ciiva.com/15189/getdatasheetpartid-370074-15189117.pdf?src-supplier=Verical, ComponentLink10URL=https://datasheet.ciiva.com/15189/getdatasheetpartid-370074-15189117.pdf?src-supplier=Verical, Depth=0.5mm, Height=0.5mm, Item Type=Capacitor, Lead Free="Lead Free", Length=1mm, Manufacturer Part Number=CC0402JRNPO9BN220, Mounting Technology="Surface Mount", Packaging="Tape and Reel", Pins=2, Pricing 1="10000=0.00220, 40000=0.00210, 150000=0.00200, 400000=0.00190, 1000000=0.00180 (USD)", Radiation Hardening=No, Reach SVHC Compliant=Yes, Resistor Type=Ceramic, RoHS=Yes, RoHS Compliant=Yes, Series=CC, Stock 1=200000, Supplier 1="Future Electronics", Termination=SMD/SMT, Thickness=0.022inch, Voltage Rating=50V, Voltage Rating (DC)=50V, Width=0.02inch
C18: library part CC0603KRX5R8BB105, "CAP CER 1UF 25V X5R 0603", Case Code (Imperial)=0603, Case Code (Metric)=1608, Dielectric=X5R, LCSC Part Number=C14664, Manufacturer=Yageo, Max Operating Temperature=85°C, Min Operating Temperature=-55°C, Package Quantity=1, Supplier Part Number 1=311-1445-1-ND, Tolerance=10%, Voltage Rating=25V, Capacitance=1uF, Case/Package=0603, Category="Ceramic Capacitors", ComponentLink1Description=https://datasheet.ciiva.com/176/mlccorderingcode-176785.pdf?src-supplier=Digi-Key, ComponentLink1URL=https://datasheet.ciiva.com/176/mlccorderingcode-176785.pdf?src-supplier=Digi-Key, ComponentLink2Description=https://datasheet.ciiva.com/176/mlccorderingcode-176786.pdf?src-supplier=Digi-Key, ComponentLink2URL=https://datasheet.ciiva.com/176/mlccorderingcode-176786.pdf?src-supplier=Digi-Key, ComponentLink3Description=https://datasheet.ciiva.com/176/mlccorderingcode-176787.pdf?src-supplier=Digi-Key, ComponentLink3URL=https://datasheet.ciiva.com/176/mlccorderingcode-176787.pdf?src-supplier=Digi-Key, ComponentLink4Description=https://datasheet.ciiva.com/17436/upy-gphc-x5r-4v-to-50v-12-17436952.pdf?src-supplier=Avnet+Europe, ComponentLink4URL=https://datasheet.ciiva.com/17436/upy-gphc-x5r-4v-to-50v-12-17436952.pdf?src-supplier=Avnet+Europe, ComponentLink5Description=https://datasheet.ciiva.com/7978/1525783-7978171.pdf?src-supplier=Element14, ComponentLink5URL=https://datasheet.ciiva.com/7978/1525783-7978171.pdf?src-supplier=Element14, ComponentLink6Description=https://datasheet.ciiva.com/11586/upy-gphc-x5r-4v-to-50v-12-11586318.pdf?src-supplier=Avnet, ComponentLink6URL=https://datasheet.ciiva.com/11586/upy-gphc-x5r-4v-to-50v-12-11586318.pdf?src-supplier=Avnet, Construction=Flat, Depth=0.8mm, Halogen Free="Halogen Free", Height=0.8mm, Item Type=Capacitor, Lead Free="Lead Free", Length=1.6mm, Manufacturer Part Number=CC0603KRX5R8BB105, Mount="Surface Mount", Number of Pins=2, Packaging="Tape and Reel", Pricing 1="1=0.12000, 10=0.08400, 50=0.04760, 100=0.03940, 500=0.02764, 1000=0.02288 (USD)", Radiation Hardening=No, REACH SVHC="No SVHC", RoHS=Yes, RoHS Compliant=Yes, Series=CC, Stock 1=919939, Supplier 1=Digi-Key, Termination=SMD/SMT, Thickness=0.035inch, Voltage Rating (DC)=25V, Width=0.031inch
C19 C20: library part C1005X7R1H104KT000F, "CAP CER 0.1UF 50V X7R 0402", Dielectric=X7R, LCSC Part Number=C361198, Manufacturer=TDK, Tolerance=10%, Voltage=25V, Category="Ceramic Capacitors", ComponentLink1Description=LCSC, ComponentLink1URL=https://www.lcsc.com/product-detail/Multilayer-Ceramic-Capacitors-MLCC-SMD-SMT_TDK-C1005X7R1H104KT000F_C361198.html, Item Type=Capacitor, Manufacturer Part Number=C1005X7R1H104KT000F, RoHS=No, Supplier 1=Avnet, Supplier Part Number 1=C1005X7R1H104KT000F
C22: library part GRM1555C1H102JA01D, "CAP CER 1000PF 50V C0G/NP0 0402", Case Code (Imperial)=0402, Case Code (Metric)=1005, Dielectric=C0G, Dielectric Material=Ceramic, Insulation Resistance=10GR, LCSC Part Number=C76947, Manufacturer=Murata, Max Operating Temperature=125°C, Min Operating Temperature=-55°C, Package Quantity=1, Temperature Coefficient=30ppm/°C, Tolerance=5%, Voltage=50V, Capacitance=1nF, Case/Package=0402, Category="Ceramic Capacitors", ComponentLink1Description=https://datasheet.ciiva.com/34302/1855908-34302849.pdf?src-supplier=Jameco, ComponentLink1URL=https://datasheet.ciiva.com/34302/1855908-34302849.pdf?src-supplier=Jameco, ComponentLink2Description=https://datasheet.ciiva.com/132/product-132800.pdf?src-supplier=Digi-Key, ComponentLink2URL=https://datasheet.ciiva.com/132/product-132800.pdf?src-supplier=Digi-Key, ComponentLink3Description=https://datasheet.ciiva.com/132/grm1555c1h102ja01-01-132799.pdf?src-supplier=Digi-Key, ComponentLink3URL=https://datasheet.ciiva.com/132/grm1555c1h102ja01-01-132799.pdf?src-supplier=Digi-Key, ComponentLink4Description=https://datasheet.ciiva.com/11786/0900766b807a1cab-11786727.pdf?src-supplier=RSComponents, ComponentLink4URL=https://datasheet.ciiva.com/11786/0900766b807a1cab-11786727.pdf?src-supplier=RSComponents, ComponentLink5Description=https://datasheet.ciiva.com/29200/453569-da-01-en-vs-kondensator-0402-29200121.pdf?src-supplier=Conrad, ComponentLink5URL=https://datasheet.ciiva.com/29200/453569-da-01-en-vs-kondensator-0402-29200121.pdf?src-supplier=Conrad, ComponentLink6Description=https://datasheet.ciiva.com/7828/4360-7828821.pdf?src-supplier=Element14, ComponentLink6URL=https://datasheet.ciiva.com/7828/4360-7828821.pdf?src-supplier=Element14, ComponentLink7Description=https://datasheet.ciiva.com/14116/grmseries-tc-hitype-eng-14116919.pdf?src-supplier=Distrelec, ComponentLink7URL=https://datasheet.ciiva.com/14116/grmseries-tc-hitype-eng-14116919.pdf?src-supplier=Distrelec, ComponentLink8Description=https://datasheet.ciiva.com/14116/grmseries-tc-hitype-eng-14116858.pdf?src-supplier=Distrelec, ComponentLink8URL=https://datasheet.ciiva.com/14116/grmseries-tc-hitype-eng-14116858.pdf?src-supplier=Distrelec, ComponentLink9Description=https://datasheet.ciiva.com/132/grm1555c1h102ja01-01-132801.pdf?src-supplier=Digi-Key, ComponentLink9URL=https://datasheet.ciiva.com/132/grm1555c1h102ja01-01-132801.pdf?src-supplier=Digi-Key, ComponentLink10Description=https://datasheet.ciiva.com/7828/1747436-7828822.pdf?src-supplier=Element14, ComponentLink10URL=https://datasheet.ciiva.com/7828/1747436-7828822.pdf?src-supplier=Element14, Construction=Flat, Depth=0.5mm, Height=0.5mm, Item Type=Capacitor, Lead Free="Lead Free", Length=1mm, Manufacturer Part Number=GRM1555C1H102JA01D, Material=Ceramic, Mount="Surface Mount", Number of Pins=2, Packaging="Tape and Reel", Pricing 1="10000=0.00648, 20000=0.00613, 40000=0.00578, 60000=0.00543, 80000=0.00508, 100000=0.00473, 1000000=0.00438 (USD)", Radiation Hardening=No, Reach SVHC Compliant=Yes, RoHS=Yes, RoHS Compliant=Yes, Series=GRM, Size=0.5mm, Stock 1=800000, Supplier 1=Avnet, Supplier Part Number 1=GRM1555C1H102JA01D, Termination=SMD/SMT, Thickness=0.022inch, Voltage Rating=50V, Voltage Rating (DC)=50V, Width=0.5mm
C23: library part CC0603JRNPO9BN821, "CAP CER 820PF 50V C0G/NPO 0603", Case Code (Imperial)=0603, Case Code (Metric)=1608, Dielectric=C0G, LCSC Part Number=C107057, Manufacturer=Yageo, Max Operating Temperature=125°C, Min Operating Temperature=-55°C, Tolerance=5%, Voltage Rating=50V, Case/Package=0603, ComponentLink1Description=https://datasheet.ciiva.com/26829/getdatasheetpartid-403541-26829388.pdf?src-supplier=Verical, ComponentLink1URL=https://datasheet.ciiva.com/26829/getdatasheetpartid-403541-26829388.pdf?src-supplier=Verical, Depth=0.8mm, Height=0.8mm, Item Type=Capacitors, Lead Free="Lead Free", Length=1.6mm, Manufacturer Part Number=CC0603JRNPO9BN821, Mounting Technology="Surface Mount", Packaging="Tape and Reel", Pins=2, Pricing="4000=0.0129, 24000=0.0087, 48000=0.0086 (USD)", Radiation Hardening=No, RoHS=Yes, RoHS Compliant=Yes, Series=CC, Stock=772000, Supplier="Arrow Electronics", Termination=SMD/SMT, Thickness=0.035inch, Voltage Rating (DC)=50V, Width=0.031inch
C24: library part CL10C102JB8NNNC, "CAP CER 1000PF 50V C0G/NP0 0603", Capacitance=1nF, Case Code (Imperial)=0603, Case Code (Metric)=1608, Dielectric=C0G, LCSC Part Number=C163508, Manufacturer=Samsung, Max Operating Temperature=125°C, Min Operating Temperature=-55°C, Package Quantity=1, Supplier Part Number 1=7665279, Temperature Coefficient=300ppm/°C, Tolerance=5%, Voltage=50V, Case/Package=0603, Category="Ceramic Capacitors", ComponentLink1Description=https://datasheet.ciiva.com/15195/getdatasheetpartid-354056-15195790.pdf?src-supplier=Verical, ComponentLink1URL=https://datasheet.ciiva.com/15195/getdatasheetpartid-354056-15195790.pdf?src-supplier=Verical, ComponentLink2Description=https://datasheet.ciiva.com/29198/458273-da-01-en-vs-kondensator-0603-29198494.pdf?src-supplier=Conrad, ComponentLink2URL=https://datasheet.ciiva.com/29198/458273-da-01-en-vs-kondensator-0603-29198494.pdf?src-supplier=Conrad, ComponentLink3Description=https://datasheet.ciiva.com/26310/mlcc-catalogdownload2013-eng-26310329.pdf?src-supplier=Distrelec, ComponentLink3URL=https://datasheet.ciiva.com/26310/mlcc-catalogdownload2013-eng-26310329.pdf?src-supplier=Distrelec, Depth=0.8mm, Height=0.8mm, Item Type=Capacitor, Lead Free="Lead Free", Length=1.6mm, Manufacturer Part Number=CL10C102JB8NNNC, Material=Ceramic, Mount="Surface Mount", Packaging="Tape and Reel", Pricing 1="4000=0.00600, 12000=0.00600, 20000=0.00600, 40000=0.00500, 100000=0.00500 (GBP)", Radiation Hardening=No, RoHS=Yes, RoHS Compliant=Yes, Series=CL, Stock 1=616000, Supplier 1=RSComponents, Thickness=0.035inch, Voltage Rating=50V, Voltage Rating (DC)=50V, Width=0.031inch
C25 C27: library part 0603B682K500NT, "50V 6.8nF X7R ±10% 0603", LCSC Part Number=C1631, Manufacturer=FH, ComponentLink1Description=LCSC, ComponentLink1URL=https://www.lcsc.com/product-detail/Multilayer-Ceramic-Capacitors-MLCC-SMD-SMT_FH-Guangdong-Fenghua-Advanced-Tech-0603B682K500NT_C1631.html, Item Type=Capacitor, Manufacturer Part Number=0603B682K500NT
C26: library part 06031C102JAT2A, "CAP CER 1000PF 100V X7R 0603", LCSC Part Number=C2179225, Manufacturer="Kyocera AVX", ComponentLink1Description=https://datasheet.ciiva.com/27056/2011951-27056177.pdf?src-supplier=Jameco, ComponentLink1URL=https://datasheet.ciiva.com/27056/2011951-27056177.pdf?src-supplier=Jameco, ComponentLink2Description=https://datasheet.ciiva.com/2987/cx7r-2987732.pdf?src-supplier=Avnet, ComponentLink2URL=https://datasheet.ciiva.com/2987/cx7r-2987732.pdf?src-supplier=Avnet, ComponentLink3Description=https://datasheet.ciiva.com/151/cx7r-151600.pdf?src-supplier=Digikey, ComponentLink3URL=https://datasheet.ciiva.com/151/cx7r-151600.pdf?src-supplier=Digikey, ComponentLink4Description=https://datasheet.ciiva.com/151/cx7r-151601.pdf?src-supplier=Digikey, ComponentLink4URL=https://datasheet.ciiva.com/151/cx7r-151601.pdf?src-supplier=Digikey, ComponentLink5Description=https://datasheet.ciiva.com/151/cx7r-151602.pdf?src-supplier=Digikey, ComponentLink5URL=https://datasheet.ciiva.com/151/cx7r-151602.pdf?src-supplier=Digikey, ComponentLink6Description=https://datasheet.ciiva.com/1124/1679506-1124194.pdf?src-supplier=Element14, ComponentLink6URL=https://datasheet.ciiva.com/1124/1679506-1124194.pdf?src-supplier=Element14, ComponentLink7Description=https://datasheet.ciiva.com/1124/1679506-1124195.pdf?src-supplier=Element14, ComponentLink7URL=https://datasheet.ciiva.com/1124/1679506-1124195.pdf?src-supplier=Element14, ComponentLink8Description=https://datasheet.ciiva.com/7855/1679506-7855032.pdf?src-supplier=Element14, ComponentLink8URL=https://datasheet.ciiva.com/7855/1679506-7855032.pdf?src-supplier=Element14, ComponentLink9Description=https://datasheet.ciiva.com/16286/cx7r-16286463.pdf?src-supplier=Future+Electronics, ComponentLink9URL=https://datasheet.ciiva.com/16286/cx7r-16286463.pdf?src-supplier=Future+Electronics, Item Type=Capacitor, Lead Free=5697LeadFree, Manufacturer Part Number=06031C102JAT2A, Material=4241ConductorMaterial, Pricing="4000=0.0243, 12000=0.0234, 20000=0.023, 40000=0.0225, 80000=0.0216 (USD)", RoHS=Yes, Stock=32000, Supplier="Future Electronics"
C28 C64: library part CC1206JKX7R9BB224, "CAP CER 0.22UF 50V X7R 1206", LCSC Part Number=C527274, Manufacturer=Yageo, Supplier Part Number=4639209, Category="Ceramic Capacitors", ComponentLink1Description=https://datasheet.ciiva.com/13210/upy-gp-np0-16v-to-50v-8-13210060.pdf?src-supplier=Mouser, ComponentLink1URL=https://datasheet.ciiva.com/13210/upy-gp-np0-16v-to-50v-8-13210060.pdf?src-supplier=Mouser, ComponentLink2Description=https://datasheet.ciiva.com/11466/upy-gphc-x7r-6-3v-to-50v-8-11466351.pdf?src-supplier=Avnet, ComponentLink2URL=https://datasheet.ciiva.com/11466/upy-gphc-x7r-6-3v-to-50v-8-11466351.pdf?src-supplier=Avnet, Item Type=Capacitor, Manufacturer Part Number=CC1206JKX7R9BB224, Pricing="3000=0.0381, 9000=0.0366, 15000=0.036, 30000=0.0351, 60000=0.0337 (USD)", RoHS=Yes, Stock=3000, Supplier="Future Electronics"
C29: library part CC0603JRNPO9BN681, "CAP CER 680PF 50V C0G/NPO 0603", Insulation Resistance=100GR, LCSC Part Number=C107055, Manufacturer=Yageo, Voltage Rating (AC)=50V, ComponentLink1Description=https://datasheet.ciiva.com/11786/0900766b8079c870-11786425.pdf?src-supplier=Rs, ComponentLink1URL=https://datasheet.ciiva.com/11786/0900766b8079c870-11786425.pdf?src-supplier=Rs, ComponentLink2Description=https://datasheet.ciiva.com/7978/1132289-7978154.pdf?src-supplier=Element14, ComponentLink2URL=https://datasheet.ciiva.com/7978/1132289-7978154.pdf?src-supplier=Element14, ComponentLink3Description=https://datasheet.ciiva.com/11587/upy-gp-np0-16v-to-50v-8-11587327.pdf?src-supplier=Avnet, ComponentLink3URL=https://datasheet.ciiva.com/11587/upy-gp-np0-16v-to-50v-8-11587327.pdf?src-supplier=Avnet, ComponentLink4Description=https://datasheet.ciiva.com/176/mlccorderingcode-176594.pdf?src-supplier=Digikey, ComponentLink4URL=https://datasheet.ciiva.com/176/mlccorderingcode-176594.pdf?src-supplier=Digikey, ComponentLink5Description=https://datasheet.ciiva.com/176/mlccorderingcode-176595.pdf?src-supplier=Digikey, ComponentLink5URL=https://datasheet.ciiva.com/176/mlccorderingcode-176595.pdf?src-supplier=Digikey, ComponentLink6Description=https://datasheet.ciiva.com/176/mlccorderingcode-176596.pdf?src-supplier=Digikey, ComponentLink6URL=https://datasheet.ciiva.com/176/mlccorderingcode-176596.pdf?src-supplier=Digikey, ComponentLink7Description=https://datasheet.ciiva.com/15165/getdatasheetpartid-26164-15165031.pdf?src-supplier=Verical, ComponentLink7URL=https://datasheet.ciiva.com/15165/getdatasheetpartid-26164-15165031.pdf?src-supplier=Verical, Halogen Free=5694HalogenFree, Item Type=Capacitors, Lead Free=5697LeadFree, Manufacturer Part Number=CC0603JRNPO9BN681, Pricing="1=0.0632, 10=0.035, 25=0.0308, 100=0.0222, 250=0.0221, 500=0.022, 1000=0.0132 (USD)", RoHS=Yes, Stock=1227, Supplier="Arrow Electronics"
C30 C33 C34 C54 C67: library part TCC0603X5R105M250CT, "1uF 25V X5R ±20% 0603 Multilayer Ceramic Capacitors MLCC - SMD/SMT ROHS", LCSC Part Number=C6266891, Manufacturer=CCTC, ComponentLink1Description=LCSC, ComponentLink1URL=https://www.lcsc.com/product-detail/Multilayer-Ceramic-Capacitors-MLCC-SMD-SMT_CCTC-TCC0603X5R105M250CT_C6266891.html, Item Type=Capacitor, Manufacturer Part Number=TCC0603X5R105M250CT
C31 C35: library part GRM188R6YA225KA12D, "CAP, 2.2µF, 35V, 10%, X5R, 0603", Case Code (Imperial)=0603, Case Code (Metric)=1608, Dielectric=X5R, LCSC Part Number=C86017, Manufacturer=Murata, Max Operating Temperature=85°C, Min Operating Temperature=-55°C, Package Quantity=4000, Supplier Part Number 1=490-7204-1-ND, Tolerance=10%, Voltage=35V, Capacitance=2.2uF, Case/Package=0603, Category="Ceramic Capacitors", ComponentLink1Description=https://datasheet.ciiva.com/14906/partnumbering-e-01-14906490.pdf?src-supplier=Digi-Key, ComponentLink1URL=https://datasheet.ciiva.com/14906/partnumbering-e-01-14906490.pdf?src-supplier=Digi-Key, ComponentLink2Description=https://datasheet.ciiva.com/14906/partnumbering-e-01-14906491.pdf?src-supplier=Digi-Key, ComponentLink2URL=https://datasheet.ciiva.com/14906/partnumbering-e-01-14906491.pdf?src-supplier=Digi-Key, ComponentLink3Description=https://datasheet.ciiva.com/14906/partnumbering-e-01-14906492.pdf?src-supplier=Digi-Key, ComponentLink3URL=https://datasheet.ciiva.com/14906/partnumbering-e-01-14906492.pdf?src-supplier=Digi-Key, Depth=0.8mm, Height=0.8mm, Item Type=Capacitor, Lead Free="Lead Free", Length=1.6mm, Manufacturer Part Number=GRM188R6YA225KA12D, Material=Ceramic, Mount="Surface Mount", Packaging="Tape and Reel", Pricing 1="1=0.21000, 10=0.14100, 50=0.08480, 100=0.07170, 500=0.04904, 1000=0.04338 (USD)", REACH SVHC="No SVHC", RoHS=Yes, RoHS Compliant=Yes, Series=GRM, Stock 1=81665, Supplier 1=Digi-Key, Termination=SMD/SMT, Thickness=0.035inch, Voltage Rating=35V, Voltage Rating (DC)=35V, Weight=0.000222oz, Width=0.8mm
C32: library part CC0603KRX5R7BB475, "CAP CER 4.7UF 16V X5R 0603", Case Code (Imperial)=0603, Case Code (Metric)=1608, Dielectric=X5R, LCSC Part Number=C277476, Manufacturer=Yageo, Max Operating Temperature=85°C, Min Operating Temperature=-55°C, Resistor Type=Ceramic, Supplier Part Number 1=311-1785-1-ND, Tolerance=10%, Voltage Rating=16V, Capacitance=4.7uF, Case/Package=0603, Category="Ceramic Capacitors", ComponentLink1Description=http://www.mouser.com/ds/2/447/UPY-GPHC_X5R_4V-to-50V_25-1131599.pdf?src-supplier=Mouser, ComponentLink1URL=http://www.mouser.com/ds/2/447/UPY-GPHC_X5R_4V-to-50V_25-1131599.pdf?src-supplier=Mouser, ComponentLink2Description=http://www.yageo.com/documents/recent/UPY-GPHC_X5R_4V-to-50V_25.pdf?src-supplier=Digi-Key, ComponentLink2URL=http://www.yageo.com/documents/recent/UPY-GPHC_X5R_4V-to-50V_25.pdf?src-supplier=Digi-Key, Depth=0.8mm, Halogen Free="Halogen Free", Height=0.8mm, Item Type=Capacitor, Lead Free="Lead Free", Length=1.6mm, Manufacturer Part Number=CC0603KRX5R7BB475, Mount="Surface Mount", Packaging="Tape and Reel", Pricing 1="1=0.20000, 10=0.13800, 50=0.08280, 100=0.06990, 500=0.04784, 1000=0.04233 (USD)", RoHS=Yes, RoHS Compliant=Yes, Series=CC, Stock 1=547703, Supplier 1=Digi-Key, Termination=SMD/SMT, Thickness=0.037inch, Voltage Rating (DC)=16V, Weight=7.1E-05oz, Width=0.8mm
C36: library part CC0805KKX5R8BB225, "CAP CER 2.2UF 25V X5R 0805", Case Code (Imperial)=0805, Case Code (Metric)=2012, Dielectric=X5R, LCSC Part Number=C277526, Manufacturer=Yageo, Max Operating Temperature=85°C, Min Operating Temperature=-55°C, Resistor Type=Ceramic, Supplier Part Number 1=603-CC805KKX5R8BB225, Tolerance=10%, Voltage Rating=25V, Capacitance=2.2uF, Case/Package=0805, Category="Ceramic Capacitors", ComponentLink1Description=https://datasheet.ciiva.com/11583/upy-gphc-x5r-4v-to-50v-12-11583590.pdf?src-supplier=Avnet, ComponentLink1URL=https://datasheet.ciiva.com/11583/upy-gphc-x5r-4v-to-50v-12-11583590.pdf?src-supplier=Avnet, Construction=Flat, Depth=1.25mm, Halogen Free="Halogen Free", Height=0.85mm, Lead Free="Lead Free", Length=2mm, Manufacturer Part Number=CC0805KKX5R8BB225, Mount="Surface Mount", Packaging="Tape and Reel", Pricing 1="1=0.33000, 10=0.15100, 50=0.15100, 100=0.14800, 500=0.14600, 1000=0.14500, 3000=0.14400, 10000=0.14400 (USD)", Radiation Hardening=No, RoHS=Yes, RoHS Compliant=Yes, Series=CC, Stock 1=2849, Supplier 1=Mouser, Thickness=0.057inch, Voltage Rating (DC)=25V, Width=0.049inch
C37 C48 C49 C52: library part GCM31A7U3A820JX01D, "CAP CER 82PF 1KV U2J 1206", LCSC Part Number=C5125804, Manufacturer=Murata, Item Type=Capacitors, Manufacturer Part Number=GCM31A7U3A820JX01D, Pricing="4000=0.07144 (USD)", RoHS=Yes, Supplier=Digikey
C38: library part KJKF222M2FF7035A075E, "2.2nF ±20% Y2 300V Plugin,P=7.5mm Safety Capacitors ROHS", LCSC Part Number=C2803195, Manufacturer=KNSCHA, Item Type=Capacitor, Manufacturer Part Number=KJKF222M2FF7035A075E, RoHS=No, Supplier=LCSC
C39 C51: library part MMK472J3AC2KN206G0, "4.7nF -40℃~+105℃ ±5% 1kV Plugin,P=10mm Polypropylene Film Capacitors (CBB) ROHS", LCSC Part Number=C2998032, Manufacturer=KNSCHA, Package=Plugin,P=10mm, ComponentLink1Description=LCSC, ComponentLink1URL=https://www.lcsc.com/product-detail/Polypropylene-Film-Capacitors-CBB_KNSCHA-MMK472J3AC2KN206G0_C2998032.html, Item Type=Capacitor, Manufacturer Part Number=MMK472J3AC2KN206G0